# Altium PCB PCB1.PcbDoc
Units mil, origin at the board's own origin, x right, y up, seen from the top; angles counter-clockwise.
Board outline 1715 x 3755 mil, 2 copper layers (Top Layer, Bottom Layer); 21 components, 0 nets, 502 pads, 16 vias.
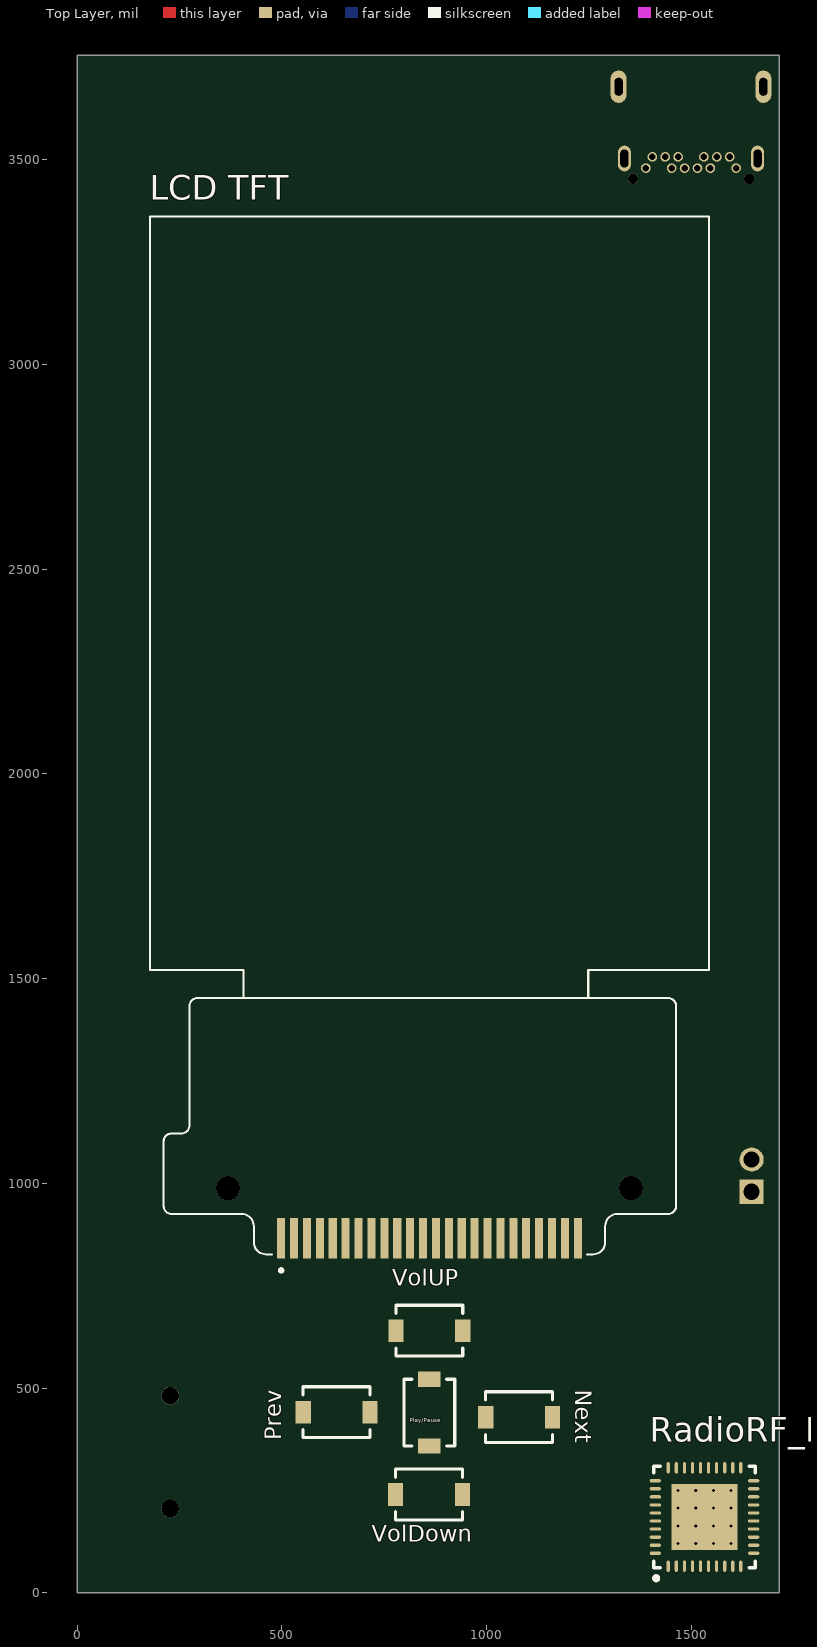
[diagram p0: Top Layer view]
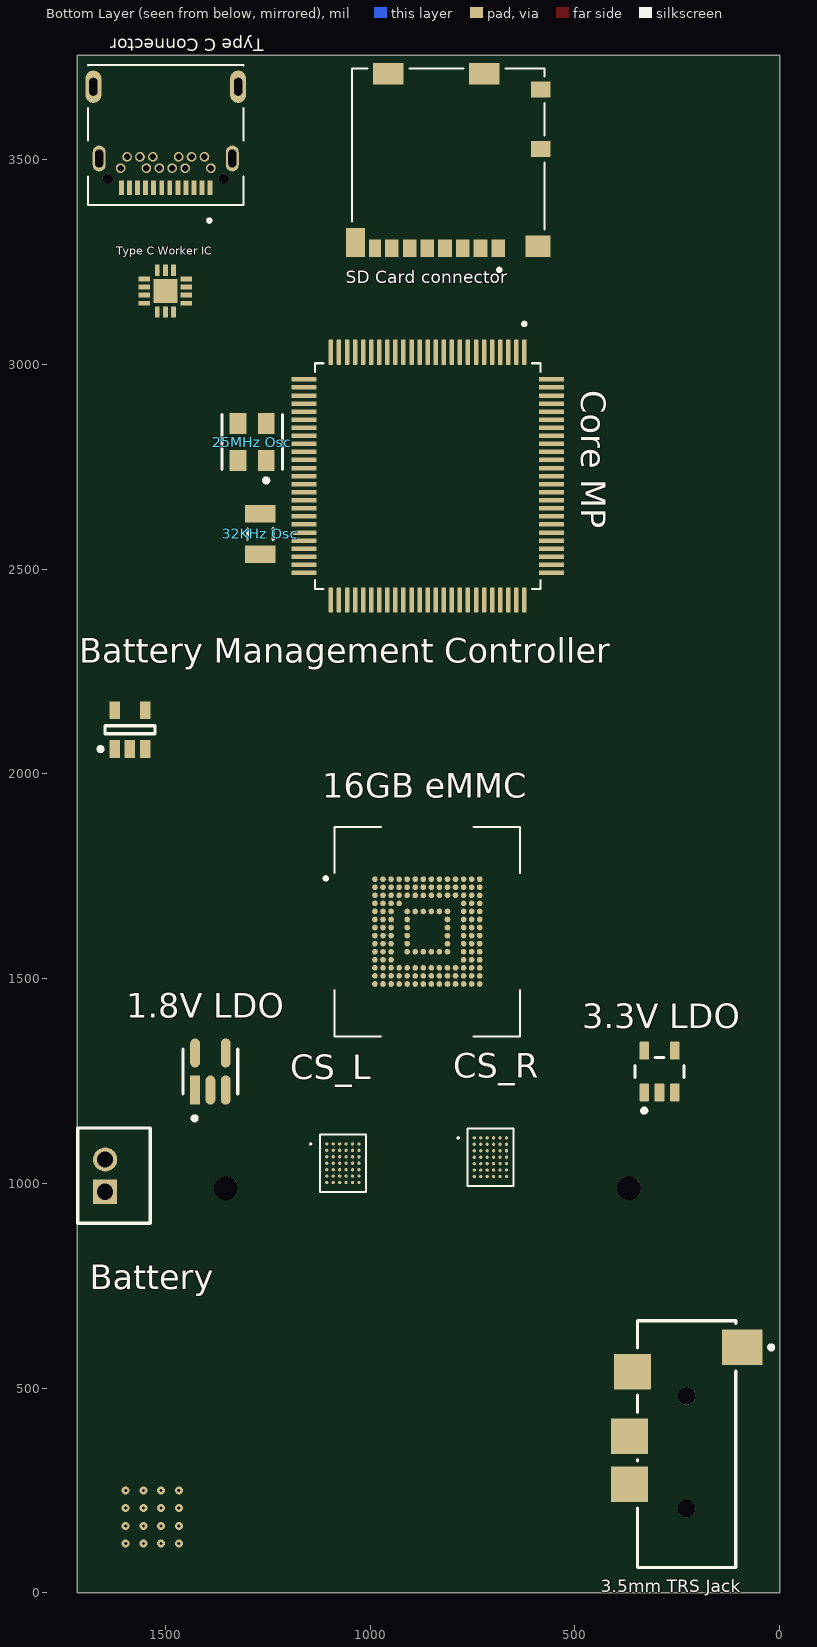
[diagram p1: Bottom Layer view, seen from below]

## Layer stack, top to bottom
Top Solder: solder mask 0.4, Solder Resist, Dk 3.5
Top Layer: signal copper 1.4
Dielectric 1: dielectric 12.6, FR-4, Dk 4.8
Bottom Layer: signal copper 1.4
Bottom Solder: solder mask 0.4, Solder Resist, Dk 3.5

## Board outline
0,0 0,3755 1715,3755 1715,0

## Design rules (kind name [scope] priority, off if disabled: settings)
Clearance [All] p1: gap=10 ignorepadtopadclearanceinfootprint=FALSE
PolygonConnect [All] p1: connectstyle=Relief reliefconductorwidth=10 reliefentries=4 polygonreliefangle="90 Angle" airgapwidth=10
RoutingVias [All] p1: holewidth=28 width=50 viastyle="Through Hole" minholewidth=28 minwidth=50 maxholewidth=28 maxwidth=50
SolderMaskExpansion [All] p1: expansion=0 istentingtop=FALSE
Width [All] p1: maxlimit=10 minlimit=10 preferedwidth=10
30 further rules are at their usual default settings.

## Components (designator, comment, footprint, x,y, rotation, side; value= is the part's Value field where it differs from the comment)
"1.8V LDO" "TLV75518PDBVR" FP-DBV0005A-IPC_A 1390,1273 r90 bottom
"3.3V LDO" "TLV75533PDBVR" FP-DBV0005A-MFG 293,1273 r90 bottom
"3.5mm TRS Jack" "SJ2-3574A-SMT-TR" FP-SJ2-3574A-SMT-TR-MFG 227,363 r90 bottom
"16GB eMMC" "EMMC08G-ML36-01B00" BGA153N50P14X14_1300X1150X100N 860.16,1614.73 r180 bottom locked
"25MHz Osc" "ABM8-25.000MHZ-10-D1G-T" FP-ABM8-MFG 1288,2810 r90 bottom
"32KHz Osc" "ABS07-32.768KHZ-4-T" FP-ABS07-MFG 1268,2585.79 r90 bottom
Battery "B2B-PH-K-S(LF)(SN)" JST-B2B-PH-K-S_V 1625.35,1018.63 r90 bottom
"Battery Management Controller" "MCP73831T-5ACI/OT" SOT-23-OT5_N 1586.4,2107.76 r90 bottom
"Core MP" "STM32H743VIT6" QFP50P1600X1600X160-100N 859.36,2727.15 r270 bottom locked
CS_L "CS43131-CNZ" BGA42C40P6X7_355X284X50N 1066.37,1049 r180 bottom
CS_R "CS43131-CNZ" BGA42C40P6X7_355X284X50N 706.13,1063.75 r180 bottom
"LCD TFT" "NHD-1.8-128160EF-CSXN#" MODULE_NHD-1.8-128160EF-CSXN# 860.25,826.63 r0 top locked
Next "TL1015AF160QG" FP-TL1015AF160QG-MFG 1079,429 r0 top
Play/Pause "TL1015AF160QG" FP-TL1015AF160QG-MFG 860,440 r90 top
Prev "TL1015AF160QG" FP-TL1015AF160QG-MFG 633.31,441 r180 top
RadioRF_FM "Si4762-A10-GMR" SLAB-QFN-40-4100x4100TP_A_N 1532,185 r90 top
"SD Card connector" "104031-0811" MOLEX_104031-0811 809.15,3498.39 r180 bottom
"Type C Connector" "10137062-00021LF" AMPHENOL_10137062-00021LF 1499,3560 r0 bottom
"Type C Worker IC" "FUSB302BMPX" QFN50P250X250X80-15N 1500,3179 r90 bottom
VolDown "TL1015AF160QG" FP-TL1015AF160QG-MFG 859,240 r180 top
VolUP "TL1015AF160QG" FP-TL1015AF160QG-MFG 860,640 r180 top

## Footprints (in the part's own frame and the unit in brackets; to place one, negate y for a bottom-side part, rotate by r counter-clockwise, add the part's x,y. Pads: shape width x height; smd on the part's side, far side on the other; paste and mask are expansions set on the pad)
AMPHENOL_10137062-00021LF [mm]
  rect 0.3x0.9 smd paste+0 mask+0.102: A1(-2.75,3.26) A2(-2.25,3.26) A3(-1.75,3.26) A4(-1.25,3.26) A5(-0.75,3.26) A6(-0.25,3.26) A7(0.25,3.26) A8(0.75,3.26) A9(1.25,3.26) A10(1.75,3.26) A11(2.25,3.26) A12(2.75,3.26)
  round 0.6 hole 0.4 mask+0.102: B1(2.8,2.05) B2(2.4,1.35) B3(1.6,1.35) B4(1.2,2.05) B5(0.8,1.35) B6(0.4,2.05) B7(-0.4,2.05) B8(-0.8,1.35) B9(-1.2,2.05) B10(-1.6,1.35) B11(-2.4,1.35) B12(-2.8,2.05)
  oval 0.8x1.6 hole 0.5 slot 1.1 at 90 deg mask+0.102: S1(-4.13,1.45) S2(4.13,1.45)
  oval 1x2 hole 0.5 slot 1.1 at 90 deg mask+0.102: S3(-4.49,-3) S4(4.49,-3)
  round 0.65 hole 0.65 unplated mask+0: ""(-3.6,2.7) ""(3.6,2.7)
  silkscreen extent -4.82,-4.35 4.82,5.4, body extent -4.83,-4.7 4.83,4, height 3.17
BGA42C40P6X7_355X284X50N [mm]
  round 0.2 smd: A1(-1,1.2) A2(-0.6,1.2) A3(-0.2,1.2) A4(0.2,1.2) A5(0.6,1.2) A6(1,1.2) B1(-1,0.8) B2(-0.6,0.8) B3(-0.2,0.8) B4(0.2,0.8) B5(0.6,0.8) B6(1,0.8) C1(-1,0.4) C2(-0.6,0.4) C3(-0.2,0.4) C4(0.2,0.4) C5(0.6,0.4) C6(1,0.4) D1(-1,0) D2(-0.6,0) D3(-0.2,0) D4(0.2,0) D5(0.6,0) D6(1,0) E1(-1,-0.4) E2(-0.6,-0.4) E3(-0.2,-0.4) E4(0.2,-0.4) E5(0.6,-0.4) E6(1,-0.4) F1(-1,-0.8) F2(-0.6,-0.8) F3(-0.2,-0.8) F4(0.2,-0.8) F5(0.6,-0.8) F6(1,-0.8) G1(-1,-1.2) G2(-0.6,-1.2) G3(-0.2,-1.2) G4(0.2,-1.2) G5(0.6,-1.2) G6(1,-1.2)
  silkscreen extent -2.05,-1.78 1.42,1.78
BGA153N50P14X14_1300X1150X100N [mm]
  round 0.35 smd paste+0 mask+0.025: A1(-3.25,3.25) A2(-2.75,3.25) A3(-2.25,3.25) A4(-1.75,3.25) A5(-1.25,3.25) A6(-0.75,3.25) A7(-0.25,3.25) A8(0.25,3.25) A9(0.75,3.25) A10(1.25,3.25) A11(1.75,3.25) A12(2.25,3.25) A13(2.75,3.25) A14(3.25,3.25) B1(-3.25,2.75) B2(-2.75,2.75) B3(-2.25,2.75) B4(-1.75,2.75) B5(-1.25,2.75) B6(-0.75,2.75) B7(-0.25,2.75) B8(0.25,2.75) B9(0.75,2.75) B10(1.25,2.75) B11(1.75,2.75) B12(2.25,2.75) B13(2.75,2.75) B14(3.25,2.75) C1(-3.25,2.25) C2(-2.75,2.25) C3(-2.25,2.25) C4(-1.75,2.25) C5(-1.25,2.25) C6(-0.75,2.25) C7(-0.25,2.25) C8(0.25,2.25) C9(0.75,2.25) C10(1.25,2.25) C11(1.75,2.25) C12(2.25,2.25) C13(2.75,2.25) C14(3.25,2.25) D1(-3.25,1.75) D2(-2.75,1.75) D3(-2.25,1.75) D4(-1.75,1.75) D12(2.25,1.75) D13(2.75,1.75) D14(3.25,1.75) E1(-3.25,1.25) E2(-2.75,1.25) E3(-2.25,1.25) E5(-1.25,1.25) E6(-0.75,1.25) E7(-0.25,1.25) E8(0.25,1.25) E9(0.75,1.25) E10(1.25,1.25) E12(2.25,1.25) E13(2.75,1.25) E14(3.25,1.25) F1(-3.25,0.75) F2(-2.75,0.75) F3(-2.25,0.75) F5(-1.25,0.75) F10(1.25,0.75) F12(2.25,0.75) F13(2.75,0.75) F14(3.25,0.75) G1(-3.25,0.25) G2(-2.75,0.25) G3(-2.25,0.25) G5(-1.25,0.25) G10(1.25,0.25) G12(2.25,0.25) G13(2.75,0.25) G14(3.25,0.25) H1(-3.25,-0.25) H2(-2.75,-0.25) H3(-2.25,-0.25) H5(-1.25,-0.25) H10(1.25,-0.25) H12(2.25,-0.25) H13(2.75,-0.25) H14(3.25,-0.25) J1(-3.25,-0.75) J2(-2.75,-0.75) J3(-2.25,-0.75) J5(-1.25,-0.75) J10(1.25,-0.75) J12(2.25,-0.75) J13(2.75,-0.75) J14(3.25,-0.75) K1(-3.25,-1.25) K2(-2.75,-1.25) K3(-2.25,-1.25) K5(-1.25,-1.25) K6(-0.75,-1.25) K7(-0.25,-1.25) K8(0.25,-1.25) K9(0.75,-1.25) K10(1.25,-1.25) K12(2.25,-1.25) K13(2.75,-1.25) K14(3.25,-1.25) L1(-3.25,-1.75) L2(-2.75,-1.75) L3(-2.25,-1.75) L12(2.25,-1.75) L13(2.75,-1.75) L14(3.25,-1.75) M1(-3.25,-2.25) M2(-2.75,-2.25) M3(-2.25,-2.25) M4(-1.75,-2.25) M5(-1.25,-2.25) M6(-0.75,-2.25) M7(-0.25,-2.25) M8(0.25,-2.25) M9(0.75,-2.25) M10(1.25,-2.25) M11(1.75,-2.25) M12(2.25,-2.25) M13(2.75,-2.25) M14(3.25,-2.25) N1(-3.25,-2.75) N2(-2.75,-2.75) N3(-2.25,-2.75) N4(-1.75,-2.75) N5(-1.25,-2.75) N6(-0.75,-2.75) N7(-0.25,-2.75) N8(0.25,-2.75) N9(0.75,-2.75) N10(1.25,-2.75) N11(1.75,-2.75) N12(2.25,-2.75) N13(2.75,-2.75) N14(3.25,-2.75) P1(-3.25,-3.25) P2(-2.75,-3.25) P3(-2.25,-3.25) P4(-1.75,-3.25) P5(-1.25,-3.25) P6(-0.75,-3.25) P7(-0.25,-3.25) P8(0.25,-3.25) P9(0.75,-3.25) P10(1.25,-3.25) P11(1.75,-3.25) P12(2.25,-3.25) P13(2.75,-3.25) P14(3.25,-3.25)
  silkscreen extent -6.4,-6.5 5.75,6.5, body extent -5.75,-6.5 5.75,6.5, height 1
FP-ABM8-MFG [mm]
  rect 1.3x1.05 smd paste+0 mask+0: 1(-1.15,-0.875) 2(1.15,-0.875) 3(1.15,0.875) 4(-1.15,0.875)
  silkscreen extent -2.5,-1.88 1.7,1.88, body extent -1.6,-1.25 1.6,1.25, height 0.8
FP-ABS07-MFG [mm]
  rect 1.1x1.9 smd paste+0 mask+0: 1(-1.25,0) 2(1.25,0)
  silkscreen extent -0.33,-0.8 0.33,0.8, body extent -1.6,-0.75 1.6,0.75, height 0.9
FP-DBV0005A-IPC_A [mm]
  rect 1.805x0.612 smd paste+0 mask+0: 1(-1.15,0.95)
  rrect100% 1.805x0.612 smd paste+0 mask+0: 2(-1.15,0) 3(-1.15,-0.95) 4(1.15,-0.95) 5(1.15,0.95)
  silkscreen extent -3.03,-1.7 1.4,1.7, body extent -1.4,-1.45 1.4,1.45, height 1.45
FP-DBV0005A-MFG [mm]
  rrect17% 1.1x0.6 smd paste+0 mask+0: 1(-1.3,0.95) 2(-1.3,0) 3(-1.3,-0.95) 4(1.3,-0.95) 5(1.3,0.95)
  silkscreen extent -2.55,-1.53 0.87,1.52, body extent -1.4,-1.45 1.4,1.45, height 1.45
FP-SJ2-3574A-SMT-TR-MFG [mm]
  rect 2.2x2.5 smd paste+0 mask+0: 1(6,-3.45)
  rect 2.2x2.3 smd paste+0 mask+0: 2(4.5,3.35) 3(0.5,3.55) 4(-2.5,3.55)
  round 1.1 hole 1.1 unplated paste-2539.97 mask+0: ""(-4,0) ""(3,0)
  silkscreen extent -7.65,-5.37 7.65,3.05, body extent -7.5,-4.2 7.5,4.2, height 5.35
FP-TL1015AF160QG-MFG [mm]
  rect 0.95x1.4 smd paste+0 mask+0: 1(-2.075,0) 2(2.075,0)
  silkscreen extent -2.07,-1.58 2.07,1.58, body extent -2.65,-1.68 2.65,1.68, height 0.25
JST-B2B-PH-K-S_V [mm] "Connector, 2-Leads, Body 5.9x4.5mm, Pitch 2mm"
  rect 1.5x1.5 hole 1: 1(-1,0.55)
  round 1.5 hole 1: 2(1,0.55)
  silkscreen extent -2.95,-2.25 2.95,2.25, body extent -2.95,-2.25 2.95,2.25, height 6
MODULE_NHD-1.8-128160EF-CSXN# [mm]
  rect 0.5x2.5 smd: 1(-9.2,1) 2(-8.4,1) 3(-7.6,1) 4(-6.8,1) 5(-6,1) 6(-5.2,1) 7(-4.4,1) 8(-3.6,1) 9(-2.8,1) 10(-2,1) 11(-1.2,1) 12(-0.4,1) 13(0.4,1) 14(1.2,1) 15(2,1) 16(2.8,1) 17(3.6,1) 18(4.4,1) 19(5.2,1) 20(6,1) 21(6.8,1) 22(7.6,1) 23(8.4,1) 24(9.2,1)
  round 1.5 hole 1.5 unplated: ""(-12.5,4.1) ""(12.5,4.1)
  silkscreen extent -17.35,-1.1 17.35,64.38
MOLEX_104031-0811 [mm]
  rect 0.85x1.1 smd: 1(3.105,-5.45) 2(2.005,-5.45) 3(0.905,-5.45) 4(-0.195,-5.45) 5(-1.295,-5.45) 6(-2.395,-5.45) 7(-3.495,-5.45)
  rect 0.75x1.1 smd: 8(-4.545,-5.45)
  rect 1.2x1 smd: 9(5.74,0.7) 10(5.74,4.4)
  rect 1.55x1.35 smd: G1(5.565,-5.325)
  rect 1.17x1.8 smd: G2(-5.755,-5.1)
  rect 1.9x1.35 smd: G3(-3.73,5.375) G4(2.24,5.375)
  silkscreen extent -5.97,-6.9 5.97,5.7
QFN50P250X250X80-15N [mm]
  rect 0.7x0.3 smd paste+0 mask+0.102: 1(-1.3,0.5) 2(-1.3,0) 3(-1.3,-0.5) 8(1.3,-0.5) 9(1.3,0) 10(1.3,0.5)
  rect 0.3x0.7 smd paste+0 mask+0.102: 4(-0.75,-1.3) 5(-0.25,-1.3) 6(0.25,-1.3) 7(0.75,-1.3) 11(0.75,1.3) 12(0.25,1.3) 13(-0.25,1.3) 14(-0.75,1.3)
  rect 1.5x1.5 smd paste+0 mask+0.102: 15(0,0)
  body extent -1.25,-1.25 1.25,1.25, height 0.8
QFP50P1600X1600X160-100N [mm]
  rrect25% 1.56x0.28 smd: 1(-7.68,6) 2(-7.68,5.5) 3(-7.68,5) 4(-7.68,4.5) 5(-7.68,4) 6(-7.68,3.5) 7(-7.68,3) 8(-7.68,2.5) 9(-7.68,2) 10(-7.68,1.5) 11(-7.68,1) 12(-7.68,0.5) 13(-7.68,0) 14(-7.68,-0.5) 15(-7.68,-1) 16(-7.68,-1.5) 17(-7.68,-2) 18(-7.68,-2.5) 19(-7.68,-3) 20(-7.68,-3.5) 21(-7.68,-4) 22(-7.68,-4.5) 23(-7.68,-5) 24(-7.68,-5.5) 25(-7.68,-6) 51(7.68,-6) 52(7.68,-5.5) 53(7.68,-5) 54(7.68,-4.5) 55(7.68,-4) 56(7.68,-3.5) 57(7.68,-3) 58(7.68,-2.5) 59(7.68,-2) 60(7.68,-1.5) 61(7.68,-1) 62(7.68,-0.5) 63(7.68,0) 64(7.68,0.5) 65(7.68,1) 66(7.68,1.5) 67(7.68,2) 68(7.68,2.5) 69(7.68,3) 70(7.68,3.5) 71(7.68,4) 72(7.68,4.5) 73(7.68,5) 74(7.68,5.5) 75(7.68,6)
  rrect25% 0.28x1.56 smd: 26(-6,-7.68) 27(-5.5,-7.68) 28(-5,-7.68) 29(-4.5,-7.68) 30(-4,-7.68) 31(-3.5,-7.68) 32(-3,-7.68) 33(-2.5,-7.68) 34(-2,-7.68) 35(-1.5,-7.68) 36(-1,-7.68) 37(-0.5,-7.68) 38(0,-7.68) 39(0.5,-7.68) 40(1,-7.68) 41(1.5,-7.68) 42(2,-7.68) 43(2.5,-7.68) 44(3,-7.68) 45(3.5,-7.68) 46(4,-7.68) 47(4.5,-7.68) 48(5,-7.68) 49(5.5,-7.68) 50(6,-7.68) 76(6,7.68) 77(5.5,7.68) 78(5,7.68) 79(4.5,7.68) 80(4,7.68) 81(3.5,7.68) 82(3,7.68) 83(2.5,7.68) 84(2,7.68) 85(1.5,7.68) 86(1,7.68) 87(0.5,7.68) 88(0,7.68) 89(-0.5,7.68) 90(-1,7.68) 91(-1.5,7.68) 92(-2,7.68) 93(-2.5,7.68) 94(-3,7.68) 95(-3.5,7.68) 96(-4,7.68) 97(-4.5,7.68) 98(-5,7.68) 99(-5.5,7.68) 100(-6,7.68)
  silkscreen extent -9.54,-7 7,7, body extent -8,-8 8,8, height 1.6
SLAB-QFN-40-4100x4100TP_A_N [mm] "QFN, 40-Leads, Body 6x6mm, Pitch 0.5mm, Thermal Pad 4.1X4.1mm, IPC Medium Density"
  oval 0.7x0.2 smd: 1(-3.05,2.25) 2(-3.05,1.75) 3(-3.05,1.25) 4(-3.05,0.75) 5(-3.05,0.25) 6(-3.05,-0.25) 7(-3.05,-0.75) 8(-3.05,-1.25) 9(-3.05,-1.75) 10(-3.05,-2.25) 21(3.05,-2.25) 22(3.05,-1.75) 23(3.05,-1.25) 24(3.05,-0.75) 25(3.05,-0.25) 26(3.05,0.25) 27(3.05,0.75) 28(3.05,1.25) 29(3.05,1.75) 30(3.05,2.25)
  oval 0.2x0.7 smd: 11(-2.25,-3.05) 12(-1.75,-3.05) 13(-1.25,-3.05) 14(-0.75,-3.05) 15(-0.25,-3.05) 16(0.25,-3.05) 17(0.75,-3.05) 18(1.25,-3.05) 19(1.75,-3.05) 20(2.25,-3.05) 31(2.25,3.05) 32(1.75,3.05) 33(1.25,3.05) 34(0.75,3.05) 35(0.25,3.05) 36(-0.25,3.05) 37(-0.75,3.05) 38(-1.25,3.05) 39(-1.75,3.05) 40(-2.25,3.05)
  rect 4.1x4.1 smd: 41(0,0)
  silkscreen extent -3.92,-3.15 3.15,3.15, body extent -3,-3 3,3, height 0.9
SOT-23-OT5_N [mm] "SOT23, 5-Leads, Body 2.9x1.7mm, Pitch 0.95mm, Lead Span 2.8mm, IPC Medium Density"
  rect 1.1x0.65 smd: 1(-1.2,0.95) 2(-1.2,0) 3(-1.2,-0.95) 4(1.2,-0.95) 5(1.2,0.95)
  silkscreen extent -1.32,-1.55 0.25,1.95, body extent -0.9,-1.55 0.9,1.55, height 1.45

## Part data
"1.8V LDO": library part CMP-04917-000157-1, "IC REG LINEAR 1.8V 500MA SOT23-5", Case/Package=SOT-23-5, Dropout Voltage=400mV, Max Input Voltage=5.5V, Max Operating Temperature=125°C, Max Output Voltage=3.3V, Min Operating Temperature=-40°C, Min Output Voltage=1.8V, Output Current=500mA, Power Supply Rejection Ratio (PSRR)=52dB, Quiescent Current=31uA, Mount="Surface Mount", Number of Regulators=1, Output Configuration=Positive, Output Type=Fixed, Packaging="Cut Tape"
"3.3V LDO": library part CMP-04917-000010-1, "IC REG LINEAR 3.3V 500MA SOT23-5", Ambient Temperature Range High=+70°C, Dropout Voltage=150mV, Manufacturer="Texas Instruments", Max Junction Temp=+125°C, Max Supply Voltage=5.5V, Min Supply Voltage=1.45V, Output Current=500mA, Output Voltage=3.3V, Package=DBV0005A, Temperature="-40°C to +125°C", Temperature Range Low=-40°C, Accuracy Percentage=1%, Automotive=No, Category=IC, ComponentLink2Description=Datasheet, ComponentLink2URL=http://www.ti.com/lit/ds/symlink/tlv755p.pdf, Device Class L1="Integrated Circuits (ICs)", Device Class L2="Power Management ICs", Device Class L3="Voltage Regulators - Linear", Digikey Description="IC REG LINEAR 3.3V 500MA SOT23-5", Height=1.45mm, Lead Free=Yes, Manufacturer Part Number=TLV75533PDBVR, Mouser Description="500-mA low-IQ small-size low-dropout (LDO) regulator 5-SOT-23 -40 to 125", Number Of Outputs=1, Octopart=https://octopart.com/tlv75533pdbvr-texas+instruments-91272349, Output Type=Fixed, RoHS=TRUE, Standoff Height=0mm, Temperature Range High=+125°C
"3.5mm TRS Jack": library part CMP-14818-000001-1, "AUDIO JACK, 3.5 MM, RT, 4 CONDUC", Current Rating=1A, Manufacturer=CUI, Temperature="-25°C to +85°C", Temperature Range High=+85°C, Temperature Range Low=-25°C, Voltage Rating=12V, Automotive=No, Category=Conn, ComponentLink2Description=Datasheet, ComponentLink2URL=https://www.cui.com/product/resource/sj2-357x-smt.pdf, Conn Orientation=Horizontal, Contact Material=Silver, Device Class L1=Connectors, Device Class L2="Audio / Video Connectors", Device Class L3=unset, Digikey Description="AUDIO JACK, 3.5 MM, RT, 4 CONDUC", Height=5.3mm, Lead Free=Yes, Manufacturer Part Number=SJ2-3574A-SMT-TR, Number Of Contacts=4, Octopart=https://octopart.com/sj2-3574a-smt-tr-cui-77838840, Package=SJ2-3574A-SMT-TR, RoHS=TRUE
"16GB eMMC": "eMMC 5.1 (HS400) 153B 8GB", Package=None, Check_prices=https://www.snapeda.com/parts/EMMC08G-ML36-01B00/Kingston/view-part/?ref=eda, MF=Kingston, MP=EMMC08G-ML36-01B00, SnapEDA_Link=https://www.snapeda.com/parts/EMMC08G-ML36-01B00/Kingston/view-part/?ref=snap
"25MHz Osc": library part CMP-27762-010178-1, "Crystal 25MHz ±10ppm 10pF SMD-4 3.2mm x 2.5mm", Case/Package=SMD/SMT, ESR (Equivalent Series Resistance)=50R, Frequency=25MHz, Frequency Stability=15ppm, Frequency Tolerance=10ppm, Load Capacitance=10pF, Max Operating Temperature=85°C, Min Operating Temperature=-40°C, Height=0.031inch, Length=0.126inch, Mount="Surface Mount", Packaging="Tape and Reel", RoHS Compliant=Yes, Width=0.098inch
"32KHz Osc": library part CMP-27762-015868-1, "Crystal 32.768kHz ±30ppm (Tol) 4pF FUND 70kΩ 2-Pin CSMD T/R", Case/Package=CSMD, ESR (Equivalent Series Resistance)=70kR, Frequency=32.768kHz, Frequency Tolerance=30ppm, Load Capacitance=12.5pF, Max Operating Temperature=85°C, Min Operating Temperature=-40°C, Operating Frequency="32.768 kHz", Package Quantity=3000, Depth=1.5mm, Height=0.035inch, Lead Free="Lead Free", Length=3.2mm, Mount="Surface Mount", Number of Pins=2, Packaging="Tape and Reel", Series=ABS07, Series Resistance=70kR, Termination=SMD/SMT, Tolerance=30ppm, Width=0.061inch
Battery: library part CMP-2000-05162-1, "Male Header, Pitch 2 mm, 1 x 2 Position, Height 6 mm, Tail Length 3.4 mm, -25 to 85 degC, RoHS, Bulk", Manufacturer=JST, Datasheet URL=http://datasheet.octopart.com/B2B-PH-K-S%28LF%29%28SN%29-JST-datasheet-8324864.pdf, Datasheet Version=Nov-08, Manufacturer URL=http://www.jst.com/home2.html, No of Positions=2, Pitch=2mm, Style/Orientation=StraightHeader/Plug, Termination=Crimp, Type=ShroudedHeader
"Battery Management Controller": library part CMP-0133-00136-1, "Miniature Single-Cell, Fully Integrated Li-Ion, Li-Polymer Charge Management Controller, 4.5V, 5-Pin SOT-23, Industrial Temperature, Tape and Reel", Code_IPC=SOT23-5, DatasheetVersion="revE, Sep-2008", PackageDescription="5-Lead Plastic Small Outline Transistor (OT) [SOT-23]", PackageReference=SOT-23-OT5, PackageVersion="revBB, Aug-2009"
"Core MP": "ARMÂ® CortexÂ®-M7 STM32H7 Microcontroller IC 32-Bit Single-Core 480MHz 2MB (2M x 8) FLASH 100-LQFP (14x14)", Package="LQFP-100 STMicroelectronics", Check_prices=https://www.snapeda.com/parts/STM32H743VIT6/STMicroelectronics/view-part/?ref=eda, MF=STMicroelectronics, MP=STM32H743VIT6, SnapEDA_Link=https://www.snapeda.com/parts/STM32H743VIT6/STMicroelectronics/view-part/?ref=snap
CS_L CS_R: "Audio D/A Converter ICs 130dB 32-bit Hi-Perf DAC w/HP Drvr ImpDet", Manufacturer_Name="Cirrus Logic", Mouser Part Number=777-CS43131-CNZ, Geometry.Height=0.8mm, Manufacturer_Part_Number=CS43131-CNZ, Mouser Price/Stock=https://www.mouser.co.uk/ProductDetail/Cirrus-Logic/CS43131-CNZ?qs=%252BEew9%252B0nqrDUhBYVE1mW3Q%3D%3D
"LCD TFT": "Graphic LCD Display Module Transmissive Red, Green, Blue (RGB) TFT - Color Parallel, 8-Bit 1.8 (45.72mm) 128 x 160", Package=None, Availability=Warning, Check_prices=https://www.snapeda.com/parts/NHD-1.8-128160EF-CSXN%23/Newhaven%20Display%20Intl/view-part/426299/?ref=eda, MF="Newhaven Display", MP=NHD-1.8-128160EF-CSXN#, Price=None, Purchase-URL=https://pricing.snapeda.com/search/part/NHD-1.8-128160EF-CSXN#/?ref=eda, SnapEDA_Link=https://www.snapeda.com/parts/NHD-1.8-128160EF-CSXN%23/Newhaven%20Display%20Intl/view-part/426299/?ref=snap
Next Play/Pause Prev VolDown VolUP: library part CMP-17879-000003-1, "SWITCH TACTILE SPST-NO 0.05A 12V", Case/Package=SMD/SMT, Color=Beige, Contact Current Rating=50mA, Contact Resistance=100mR, Max Operating Temperature=70°C, Max Voltage Rating (DC)=12V, Min Operating Temperature=-20°C, Operating Force=160gf, Package Quantity=1, Actuator Length=0.5mm, Actuator Material=Nylon, Actuator Type=Standard, Contact Material=Silver, Contact Plating=Silver, Current Rating=50mA, Electrical Life=50000Cycles, Illumination Type=Non-Illuminated, Lead Free="Lead Free", Mechanical Life=200000Cycles, Mount="Surface Mount", Orientation=Straight, Packaging="Tape and Reel", REACH SVHC="No SVHC", Switch Function=Off-Mom, Switch Travel=0.2mm, Termination="Gull Wing", Throw Configuration=SPST, Voltage Rating (DC)=12V
RadioRF_FM: library part CMP-0501-00106-1, "High-Performance Automotive AM / FM Radio Receiver and HD Radio Tuner, -40 to 85 degC, 40-pin QFN, Tape and Reel", Manufacturer="Silicon Labs", Code_IPC=J-STD-020, Code_JEDEC=MO-220, ComponentLink1Description="Manufacturer URL", ComponentLink1URL=http://www.silabs.com/, ComponentLink2Description=Datasheet, ComponentLink2URL="http://www.silabs.com/Support Documents/TechnicalDocs/Si476x-short.pdf", ComponentLink3Description="Package Specification", ComponentLink3URL=http://www.silabs.com/Support%20Documents/TechnicalDocs/Si3452.pdf, Mounting Technology="Surface Mount", PackageDescription="40-Pin Quad-Flat No-Leads Package, Body 6 x 6 mm, Pitch 0.5 mm", PackageReference=QFN-40, PackageVersion="Rev. 1.3, 01/2012", Packing="Tape and Reel", PartNumber=Si4762-A10-GMR, RDS Support=TRUE, Sub-Family="Automotive Tuners"
"SD Card connector": "Surface Mount Micro SD Card Connector, with Push In Termination", Package=None, Check_prices=https://www.snapeda.com/parts/104031-0811/Molex/view-part/?ref=eda, MF=Molex, MP=104031-0811, SnapEDA_Link=https://www.snapeda.com/parts/104031-0811/Molex/view-part/?ref=snap
"Type C Connector": "USB-C (USB TYPE-C) USB 3.2 Gen 2 (USB 3.1 Gen 2, Superspeed + (USB 3.1)) Receptacle Connector 24 Position Surface Mount, Right Angle; Through Hole", Package=None, Check_prices=https://www.snapeda.com/parts/1013706200021LF/Amphenol/view-part/?ref=eda, MF=Amphenol, MP=1013706200021LF, SnapEDA_Link=https://www.snapeda.com/parts/1013706200021LF/Amphenol/view-part/?ref=snap
"Type C Worker IC": "USB Controller USB 3.1 USB Interface 14-MLP (2.5x2.5)", Package="WQFN-14 ON Semiconductor", Check_prices=https://www.snapeda.com/parts/FUSB302BMPX/Onsemi/view-part/?ref=eda, MF="ON Semiconductor", MP=FUSB302BMPX, SnapEDA_Link=https://www.snapeda.com/parts/FUSB302BMPX/Onsemi/view-part/?ref=snap

## Via types
v1: diameter 19.68, hole 7.87, Top Layer to Bottom Layer, 16 vias

## Nets (pads, with @x,y where several pads share a name; then routed paths per layer and width w, separated by ;. In a path a pad name is that pad's centre, name@x,y a point inside that pad or via, vN(x,y) a via of type N, cw(c..) or ccw(c..) an arc to the next point about the centre after c; other vN are vias at no path point)
pads on no net: "1.8V LDO.1" "1.8V LDO.2" "1.8V LDO.3" "1.8V LDO.4" "1.8V LDO.5" "3.3V LDO.1" "3.3V LDO.2" "3.3V LDO.3" "3.3V LDO.4" "3.3V LDO.5" "3.5mm TRS Jack.1" "3.5mm TRS Jack.2" "3.5mm TRS Jack.3" "3.5mm TRS Jack.4" "3.5mm TRS Jack." "16GB eMMC.A1" "16GB eMMC.A2" "16GB eMMC.A3" "16GB eMMC.A4" "16GB eMMC.A5" "16GB eMMC.A6" "16GB eMMC.A7" "16GB eMMC.A8" "16GB eMMC.A9" "16GB eMMC.A10" "16GB eMMC.A11" "16GB eMMC.A12" "16GB eMMC.A13" "16GB eMMC.A14" "16GB eMMC.B1" "16GB eMMC.B2" "16GB eMMC.B3" "16GB eMMC.B4" "16GB eMMC.B5" "16GB eMMC.B6" "16GB eMMC.B7" "16GB eMMC.B8" "16GB eMMC.B9" "16GB eMMC.B10" "16GB eMMC.B11" "16GB eMMC.B12" "16GB eMMC.B13" "16GB eMMC.B14" "16GB eMMC.C1" "16GB eMMC.C2" "16GB eMMC.C3" "16GB eMMC.C4" "16GB eMMC.C5" "16GB eMMC.C6" "16GB eMMC.C7" "16GB eMMC.C8" "16GB eMMC.C9" "16GB eMMC.C10" "16GB eMMC.C11" "16GB eMMC.C12" "16GB eMMC.C13" "16GB eMMC.C14" "16GB eMMC.D1" "16GB eMMC.D2" "16GB eMMC.D3" "16GB eMMC.D4" "16GB eMMC.D12" "16GB eMMC.D13" "16GB eMMC.D14" "16GB eMMC.E1" "16GB eMMC.E2" "16GB eMMC.E3" "16GB eMMC.E5" "16GB eMMC.E6" "16GB eMMC.E7" "16GB eMMC.E8" "16GB eMMC.E9" "16GB eMMC.E10" "16GB eMMC.E12" "16GB eMMC.E13" "16GB eMMC.E14" "16GB eMMC.F1" "16GB eMMC.F2" "16GB eMMC.F3" "16GB eMMC.F5" "16GB eMMC.F10" "16GB eMMC.F12" "16GB eMMC.F13" "16GB eMMC.F14" "16GB eMMC.G1" "16GB eMMC.G2" "16GB eMMC.G3" "16GB eMMC.G5" "16GB eMMC.G10" "16GB eMMC.G12" "16GB eMMC.G13" "16GB eMMC.G14" "16GB eMMC.H1" "16GB eMMC.H2" "16GB eMMC.H3" "16GB eMMC.H5" "16GB eMMC.H10" "16GB eMMC.H12" "16GB eMMC.H13" "16GB eMMC.H14" "16GB eMMC.J1" "16GB eMMC.J2" "16GB eMMC.J3" "16GB eMMC.J5" "16GB eMMC.J10" "16GB eMMC.J12" "16GB eMMC.J13" "16GB eMMC.J14" "16GB eMMC.K1" "16GB eMMC.K2" "16GB eMMC.K3" "16GB eMMC.K5" "16GB eMMC.K6" "16GB eMMC.K7" "16GB eMMC.K8" "16GB eMMC.K9" "16GB eMMC.K10" "16GB eMMC.K12" "16GB eMMC.K13" "16GB eMMC.K14" "16GB eMMC.L1" "16GB eMMC.L2" "16GB eMMC.L3" "16GB eMMC.L12" "16GB eMMC.L13" "16GB eMMC.L14" "16GB eMMC.M1" "16GB eMMC.M2" "16GB eMMC.M3" "16GB eMMC.M4" "16GB eMMC.M5" "16GB eMMC.M6" "16GB eMMC.M7" "16GB eMMC.M8" "16GB eMMC.M9" "16GB eMMC.M10" "16GB eMMC.M11" "16GB eMMC.M12" "16GB eMMC.M13" "16GB eMMC.M14" "16GB eMMC.N1" "16GB eMMC.N2" "16GB eMMC.N3" "16GB eMMC.N4" "16GB eMMC.N5" "16GB eMMC.N6" "16GB eMMC.N7" "16GB eMMC.N8" "16GB eMMC.N9" "16GB eMMC.N10" "16GB eMMC.N11" "16GB eMMC.N12" "16GB eMMC.N13" "16GB eMMC.N14" "16GB eMMC.P1" "16GB eMMC.P2" "16GB eMMC.P3" "16GB eMMC.P4" "16GB eMMC.P5" "16GB eMMC.P6" "16GB eMMC.P7" "16GB eMMC.P8" "16GB eMMC.P9" "16GB eMMC.P10" "16GB eMMC.P11" "16GB eMMC.P12" "16GB eMMC.P13" "16GB eMMC.P14" "25MHz Osc.1" "25MHz Osc.2" "25MHz Osc.3" "25MHz Osc.4" "32KHz Osc.1" "32KHz Osc.2" "Battery Management Controller.1" "Battery Management Controller.2" "Battery Management Controller.3" "Battery Management Controller.4" "Battery Management Controller.5" "Core MP.1" "Core MP.2" "Core MP.3" "Core MP.4" "Core MP.5" "Core MP.6" "Core MP.7" "Core MP.8" "Core MP.9" "Core MP.10" "Core MP.11" "Core MP.12" "Core MP.13" "Core MP.14" "Core MP.15" "Core MP.16" "Core MP.17" "Core MP.18" "Core MP.19" "Core MP.20" "Core MP.21" "Core MP.22" "Core MP.23" "Core MP.24" "Core MP.25" "Core MP.26" "Core MP.27" "Core MP.28" "Core MP.29" "Core MP.30" "Core MP.31" "Core MP.32" "Core MP.33" "Core MP.34" "Core MP.35" "Core MP.36" "Core MP.37" "Core MP.38" "Core MP.39" "Core MP.40" "Core MP.41" "Core MP.42" "Core MP.43" "Core MP.44" "Core MP.45" "Core MP.46" "Core MP.47" "Core MP.48" "Core MP.49" "Core MP.50" "Core MP.51" "Core MP.52" "Core MP.53" "Core MP.54" "Core MP.55" "Core MP.56" "Core MP.57" "Core MP.58" "Core MP.59" "Core MP.60" "Core MP.61" "Core MP.62" "Core MP.63" "Core MP.64" "Core MP.65" "Core MP.66" "Core MP.67" "Core MP.68" "Core MP.69" "Core MP.70" "Core MP.71" "Core MP.72" "Core MP.73" "Core MP.74" "Core MP.75" "Core MP.76" "Core MP.77" "Core MP.78" "Core MP.79" "Core MP.80" "Core MP.81" "Core MP.82" "Core MP.83" "Core MP.84" "Core MP.85" "Core MP.86" "Core MP.87" "Core MP.88" "Core MP.89" "Core MP.90" "Core MP.91" "Core MP.92" "Core MP.93" "Core MP.94" "Core MP.95" "Core MP.96" "Core MP.97" "Core MP.98" "Core MP.99" "Core MP.100" "LCD TFT.1" "LCD TFT.2" "LCD TFT.3" "LCD TFT.4" "LCD TFT.5" "LCD TFT.6" "LCD TFT.7" "LCD TFT.8" "LCD TFT.9" "LCD TFT.10" "LCD TFT.11" "LCD TFT.12" "LCD TFT.13" "LCD TFT.14" "LCD TFT.15" "LCD TFT.16" "LCD TFT.17" "LCD TFT.18" "LCD TFT.19" "LCD TFT.20" "LCD TFT.21" "LCD TFT.22" "LCD TFT.23" "LCD TFT.24" "LCD TFT." "SD Card connector.1" "SD Card connector.2" "SD Card connector.3" "SD Card connector.4" "SD Card connector.5" "SD Card connector.6" "SD Card connector.7" "SD Card connector.8" "SD Card connector.9" "SD Card connector.10" "SD Card connector.G1" "SD Card connector.G2" "SD Card connector.G3" "SD Card connector.G4" "Type C Connector." "Type C Connector.A1" "Type C Connector.A2" "Type C Connector.A3" "Type C Connector.A4" "Type C Connector.A5" "Type C Connector.A6" "Type C Connector.A7" "Type C Connector.A8" "Type C Connector.A9" "Type C Connector.A10" "Type C Connector.A11" "Type C Connector.A12" "Type C Connector.B1" "Type C Connector.B2" "Type C Connector.B3" "Type C Connector.B4" "Type C Connector.B5" "Type C Connector.B6" "Type C Connector.B7" "Type C Connector.B8" "Type C Connector.B9" "Type C Connector.B10" "Type C Connector.B11" "Type C Connector.B12" "Type C Connector.S1" "Type C Connector.S2" "Type C Connector.S3" "Type C Connector.S4" "Type C Worker IC.1" "Type C Worker IC.2" "Type C Worker IC.3" "Type C Worker IC.4" "Type C Worker IC.5" "Type C Worker IC.6" "Type C Worker IC.7" "Type C Worker IC.8" "Type C Worker IC.9" "Type C Worker IC.10" "Type C Worker IC.11" "Type C Worker IC.12" "Type C Worker IC.13" "Type C Worker IC.14" "Type C Worker IC.15" Battery.1 Battery.2 CS_L.A1 CS_L.A2 CS_L.A3 CS_L.A4 CS_L.A5 CS_L.A6 CS_L.B1 CS_L.B2 CS_L.B3 CS_L.B4 CS_L.B5 CS_L.B6 CS_L.C1 CS_L.C2 CS_L.C3 CS_L.C4 CS_L.C5 CS_L.C6 CS_L.D1 CS_L.D2 CS_L.D3 CS_L.D4 CS_L.D5 CS_L.D6 CS_L.E1 CS_L.E2 CS_L.E3 CS_L.E4 CS_L.E5 CS_L.E6 CS_L.F1 CS_L.F2 CS_L.F3 CS_L.F4 CS_L.F5 CS_L.F6 CS_L.G1 CS_L.G2 CS_L.G3 CS_L.G4 CS_L.G5 CS_L.G6 CS_R.A1 CS_R.A2 CS_R.A3 CS_R.A4 CS_R.A5 CS_R.A6 CS_R.B1 CS_R.B2 CS_R.B3 CS_R.B4 CS_R.B5 CS_R.B6 CS_R.C1 CS_R.C2 CS_R.C3 CS_R.C4 CS_R.C5 CS_R.C6 CS_R.D1 CS_R.D2 CS_R.D3 CS_R.D4 CS_R.D5 CS_R.D6 CS_R.E1 CS_R.E2 CS_R.E3 CS_R.E4 CS_R.E5 CS_R.E6 CS_R.F1 CS_R.F2 CS_R.F3 CS_R.F4 CS_R.F5 CS_R.F6 CS_R.G1 CS_R.G2 CS_R.G3 CS_R.G4 CS_R.G5 CS_R.G6 Next.1 Next.2 Play/Pause.1 Play/Pause.2 Prev.1 Prev.2 RadioRF_FM.1 RadioRF_FM.2 RadioRF_FM.3 RadioRF_FM.4 RadioRF_FM.5 RadioRF_FM.6 RadioRF_FM.7 RadioRF_FM.8 RadioRF_FM.9 RadioRF_FM.10 RadioRF_FM.11 RadioRF_FM.12 RadioRF_FM.13 RadioRF_FM.14 RadioRF_FM.15 RadioRF_FM.16 RadioRF_FM.17 RadioRF_FM.18 RadioRF_FM.19 RadioRF_FM.20 RadioRF_FM.21 RadioRF_FM.22 RadioRF_FM.23 RadioRF_FM.24 RadioRF_FM.25 RadioRF_FM.26 RadioRF_FM.27 RadioRF_FM.28 RadioRF_FM.29 RadioRF_FM.30 RadioRF_FM.31 RadioRF_FM.32 RadioRF_FM.33 RadioRF_FM.34 RadioRF_FM.35 RadioRF_FM.36 RadioRF_FM.37 RadioRF_FM.38 RadioRF_FM.39 RadioRF_FM.40 RadioRF_FM.41 VolDown.1 VolDown.2 VolUP.1 VolUP.2
copper on no net:
  other v1: 1467.04,120.04 1510.35,120.04 1553.65,120.04 1596.96,120.04 1467.04,163.35 1510.35,163.35 1553.65,163.35 1596.96,163.35 1467.04,206.65 1510.35,206.65 1553.65,206.65 1596.96,206.65 1467.04,249.96 1510.35,249.96 1553.65,249.96 1596.96,249.96

## Silkscreen, mask and mechanical layers (free items; w line width, h text height)
Top Overlay:
Drill Drawing:
  lines w10: -12,440 1747,440 ; 860,0 860,3755